# Altium PCB PCB.PcbDoc (part 4 of 9)
Units mil, origin at the board's own origin, x right, y up, seen from the top; angles counter-clockwise.
Board outline 4330.71 x 3149.61 mil, 8 copper layers (L1_TOP, L2_GND, L3_SIG, L4_PWR, L5_PWR, L6_SIG, L7_GND, L8_BOT), stack 62.406 mil thick; 660 components, 433 nets, 2602 pads, 1254 vias.
Unrouted connection lines stored in the file: 930.
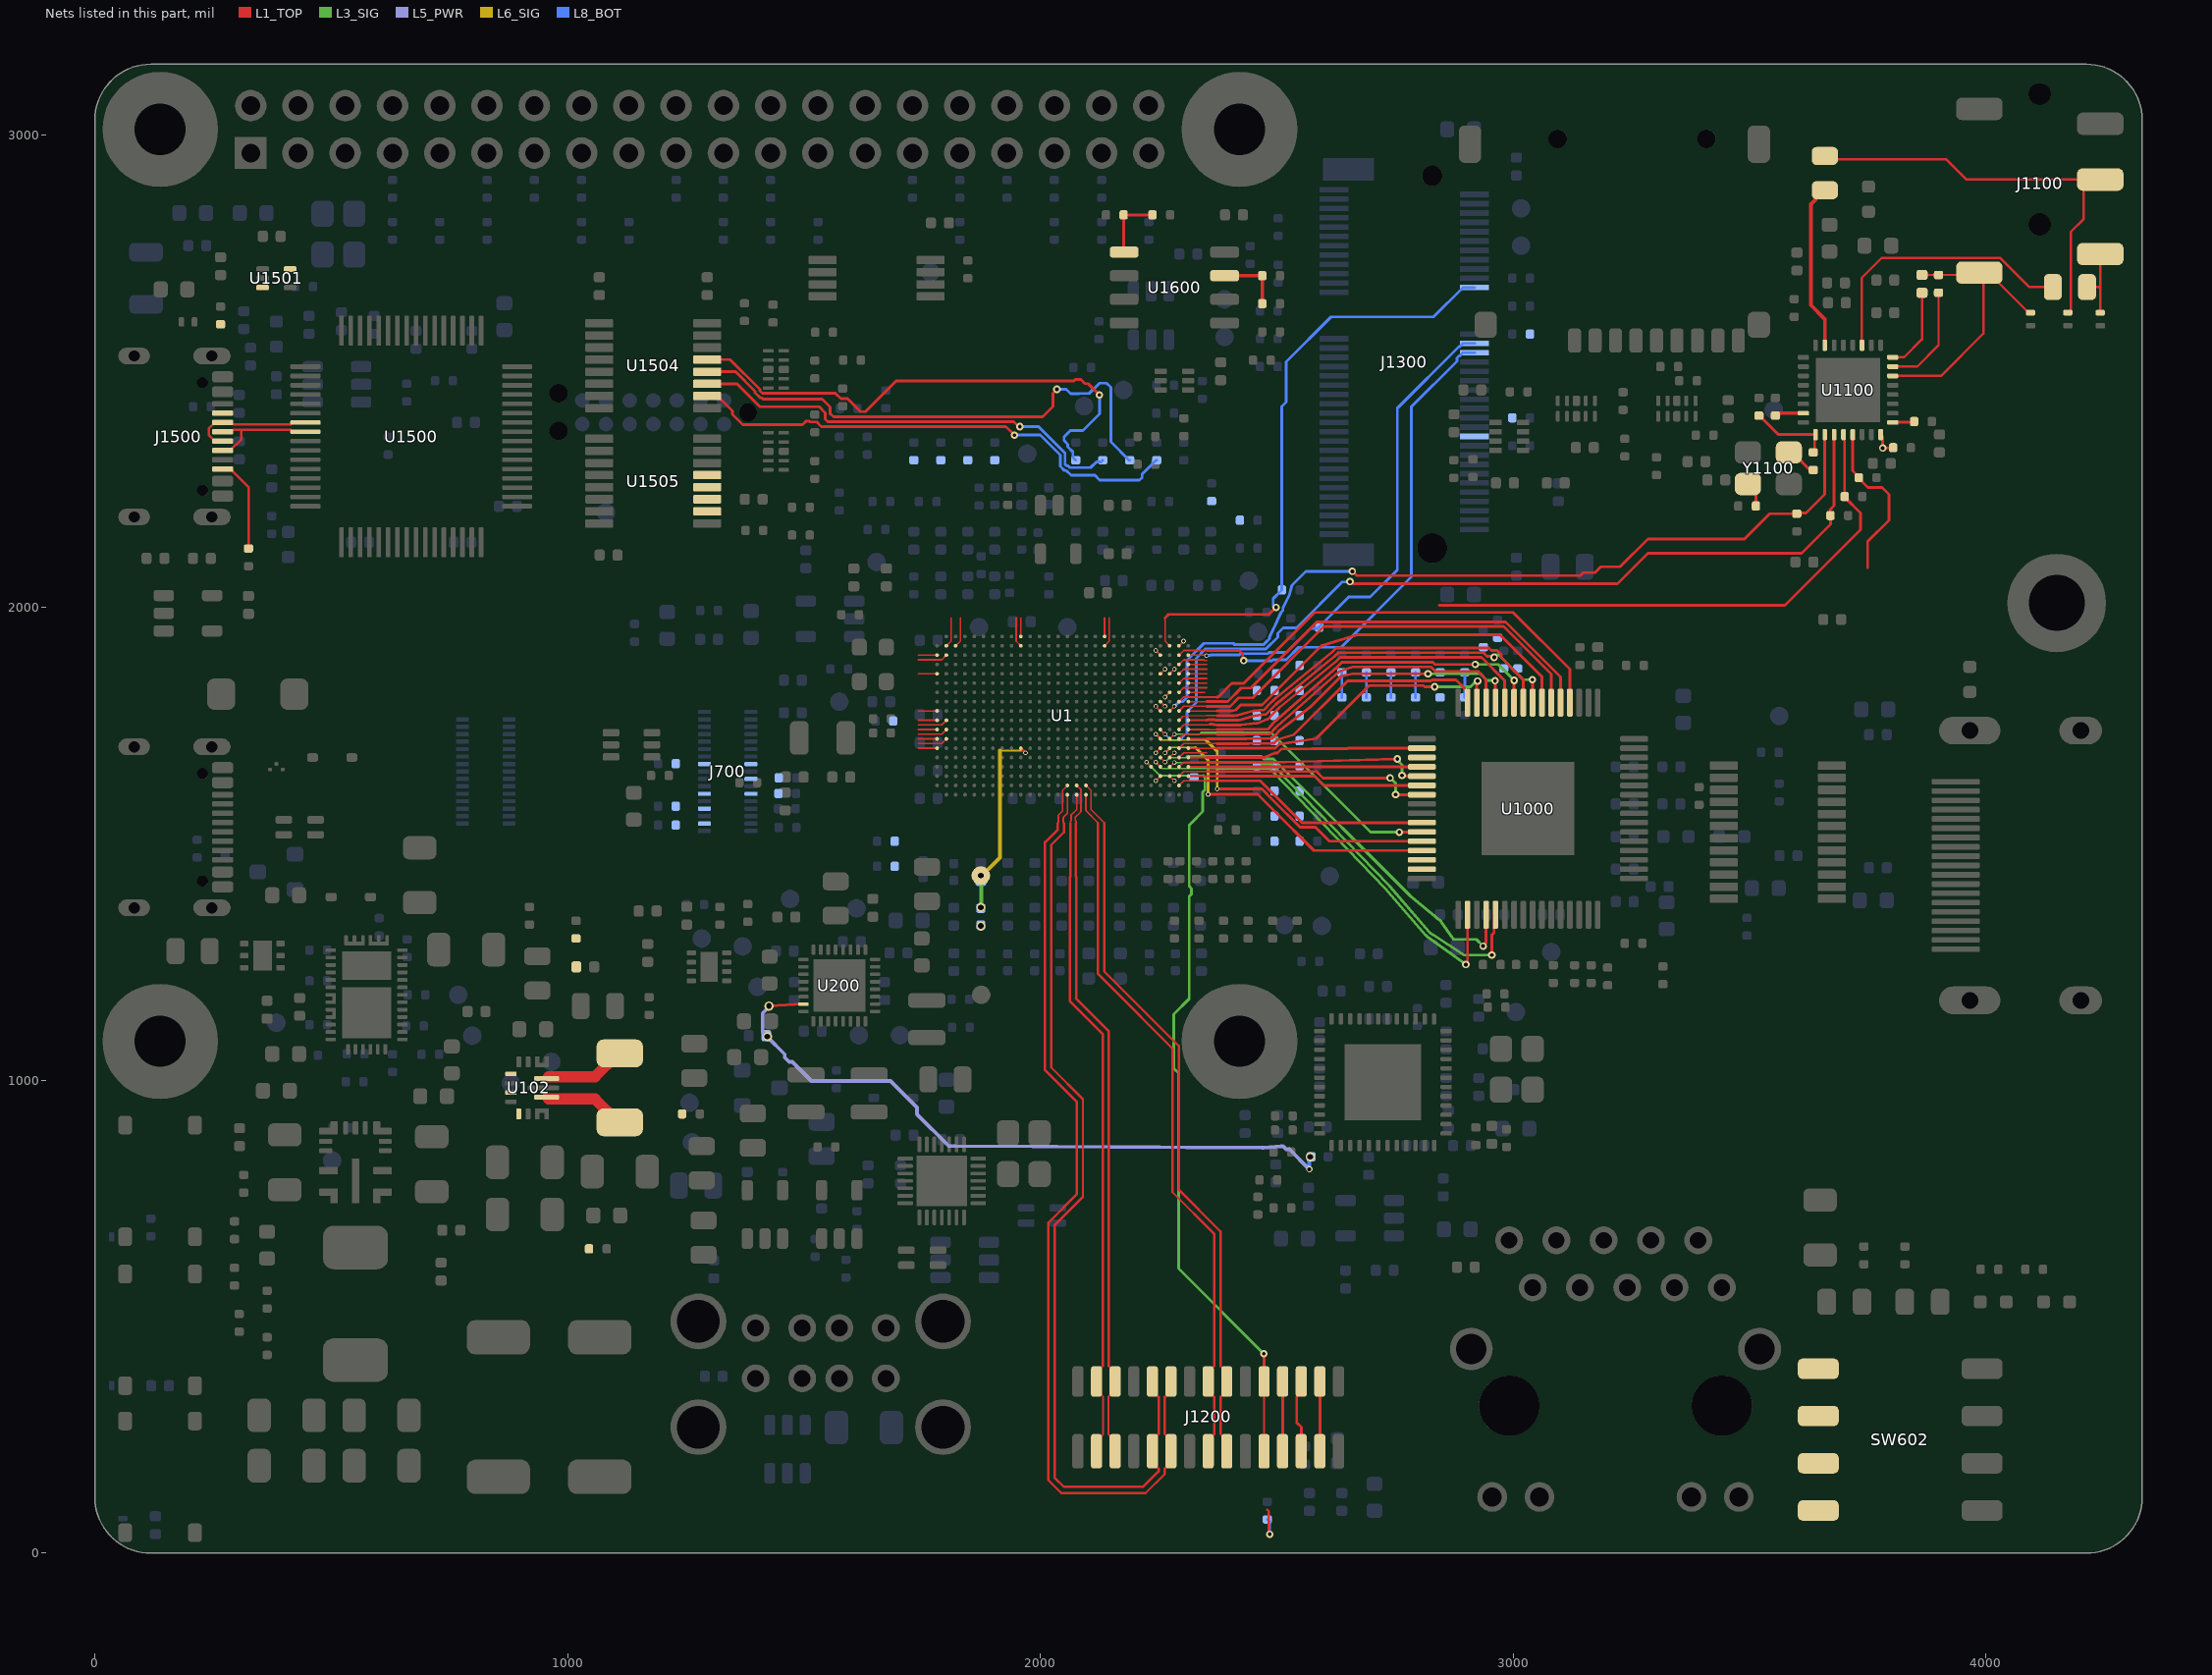
[diagram p7: the nets of this part, all layers, seen from the top]

## Via types
v1: diameter 19.68, hole 11.81, L1_TOP to L8_BOT, 865 vias
v2: diameter 9.84, hole 5.91, L1_TOP to L8_BOT, 246 vias
v3: diameter 15.75, hole 7.87, L1_TOP to L8_BOT, 125 vias
v4: diameter 13.78, hole 7.87, L1_TOP to L8_BOT, 18 vias

## Nets (pads, with @x,y where several pads share a name; then routed paths per layer and width w, separated by ;. In a path a pad name is that pad's centre, name@x,y a point inside that pad or via, vN(x,y) a via of type N, cw(c..) or ccw(c..) an arc to the next point about the centre after c; other vN are vias at no path point) (continued)
DBG_MAIN_UART0_TXD: (continued)
  L1_TOP w5.91: U1504.11@1295.28,2473.43 1358.37,2473.43 1406.79,2425 1532.27,2425 1545,2412.27 1545,2398.46 1550.27,2393.19 1943.63,2393.19 1953.87,2382.96 v3(1956.53,2382.96)
  L8_BOT w5.91: v3(1956.53,2382.96) 1995.96,2382.96 2051.96,2326.96 2051.96,2303.46 2055.42,2300 2058.92,2300 2062.66,2296.26 2106.26,2296.26 2118.54,2308.54 2128.42,2308.54 R1512.2@2131.89,2312.01
DBG_MAIN_UART1_RXD: R1513.2 U1.A19 U1504.12 | length 1170.9
  L1_TOP w3.54: U1.A19@2135.83,1938.98 2135.83,1978.35
  L1_TOP w5.91: U1504.12@1295.28,2499.02 1355.27,2499.02 1396.65,2457.64 1396.65,2454.85 1407.61,2443.9 1410.39,2443.9 1413.15,2441.14 1538.86,2441.14 1555.43,2424.57 1555.43,2410.65 1562.54,2403.54 2004.62,2403.54 2026.79,2425.71 2026.79,2453.79 v3(2034.99,2462)
  L8_BOT w5.91: v3(2034.99,2462) 2054.95,2462 2064.1,2452.84 2081.4,2452.84 2081.51,2452.95 2102.95,2452.95 2125,2475 2140,2475 2149.02,2465.98 2149.02,2350.98 2187.99,2312.01 R1513.2@2188.98,2312.01
DBG_MAIN_UART1_TXD: R1514.2 U1.B19 U1504.10 | length 1134.2
  L1_TOP w3.54: U1.B19@2135.83,1919.29 2145.67,1929.13 2145.67,1978.35
  L1_TOP w5.91: U1504.10@1295.28,2447.83 1315.94,2447.83 1325.79,2437.99 1326.52,2437.99 1348.35,2416.16 1348.35,2408.84 1370.18,2387.01 1497.01,2387.01 1505,2395 1510.57,2395 1512.85,2392.72 1527.15,2392.72 1536.52,2383.35 1926.65,2383.35 v3(1945,2365)
  L8_BOT w5.91: v3(1945,2365) 2000,2365 2042.12,2322.88 2042.12,2298.96 2050.92,2290.16 2054.84,2290.16 2065,2280 2115.33,2280 2125.65,2269.68 2209.68,2269.68 2215,2275 2215,2281.93 2245.08,2312.01 R1514.2@2246.06,2312.01
DBG_MCU_UART0_RXD: R1515.2 U1.B2 U1505.13 | length 63.1
  L1_TOP w3.54: U1.B2@1801.18,1919.29 1811.02,1929.13 1811.02,1978.35
DBG_MCU_UART0_TXD: R1516.2 U1.B3 U1505.11 | length 63.1
  L1_TOP w3.54: U1.B3@1820.87,1919.29 1830.71,1929.13 1830.71,1978.35
DBG_USB_CC1: J1500.A5 R1500.1
DBG_USB_CC2: J1500.B5 R1501.1 | length 200.7
  L1_TOP w5.12: J1500.B5@270.08,2293.31 286.61,2293.31 324.8,2255.12 R1501.1@324.8,2125
DBG_USB_DM: J1500.A7 J1500.B7 U1500.7 U1501.5 | length 261.6
  L1_TOP w5.34: J1500.A7@270.08,2352.36 253.54,2352.36 241.03,2364.88 241.03,2379.22 253.54,2391.73 J1500.B7@270.08,2391.73 273.14,2388.67 291.87,2388.67 292.98,2387.56 414.13,2387.56 418.31,2391.73 U1500.7@445.37,2391.73
DBG_USB_DP: J1500.A6 J1500.B6 U1500.8 U1501.3 | length 248.5
  L1_TOP w5.34: J1500.B6@270.08,2332.68 286.61,2332.68 310,2356.06 310,2376.22 ; J1500.A6@270.08,2372.05 273.14,2375.11 291.87,2375.11 292.98,2376.22 310,2376.22 ; U1500.8@445.37,2372.05 418.31,2372.05 414.13,2376.22 310,2376.22
DBG_WKUP_UART0_RXD: R1517.2 U1.C2 U1505.12 | length 63.1
  L1_TOP w3.54: 1742.13,1889.76 1791.34,1889.76 U1.C2@1801.18,1899.61
DBG_WKUP_UART0_TXD: R1518.2 U1.C1 U1505.10 | length 39.4
  L1_TOP w3.54: 1742.13,1899.61 U1.C1@1781.5,1899.61
DDR4_VPP_2V5: C219.1 FB302.1 FB800.1 U200.23 | length 1451.6
  L1_TOP w6.3: v1(1426.18,1157.48) U200.23@1499.02,1161.42
  L5_PWR w7.87: v1@1427.17,1156.5 1412.4,1141.73 1412.4,1102.36 1422.24,1092.52 1459.25,1055.51 1459.25,1048.48 1468.48,1039.25 1475.51,1039.25 1515.75,999.02 1683.07,999.02 1739.25,942.83 1739.25,928.48 1806.51,861.22 1820.87,861.22 2469.89,857.28 ccw(c2470,875) 2471.64,857.36 2509.48,860.88 cw(c2510.21,853.04) 2515.78,858.61 2520.13,854.25 2526.65,854.25 v4(2568.9,812.01)
  L8_BOT w7.87: v4(2568.9,812.01) FB800.1@2568.9,836.61
  L8_BOT w15.75: C219.1@1420.47,1094.49 v1(1422.44,1092.52) ; v1(2570.87,838.58) FB800.1@2572.83,838.58
  other v1: 1874.02,1326.77
DDR4_VPP_2V5_SIP: C321.1 FB302.2 TP307.1 U1.N10 | length 429.1
  L1_TOP w5.91: U1.N10@1958.66,1702.76 v2(1968.5,1692.91)
  L3_SIG w7.87: v1@1875,1368.11 v1@1875,1432.09
  L6_SIG w3.54: 1914.37,1697.83 1963.58,1697.83 v2(1968.5,1692.91)
  L6_SIG w7.87: v1@1875,1432.09 1914.37,1471.46 1914.37,1540.35 1914.37,1697.83
  L8_BOT w15.75: FB302.2@1874.02,1364.17 v1(1874.02,1366.14) ; C321.1@1874.02,1422.05 v1(1874.02,1433.07)
DPI_D0: U1.P26 U1000.63 | length 13.9
  L1_TOP w3.54: U1.P26@2273.62,1683.07 v2(2283.46,1692.91)
DPI_D1: U1.N25 U1000.62 | length 13.9
  L1_TOP w3.54: v2(2244.09,1692.91) U1.N25@2253.94,1702.76
DPI_D2: U1.N26 U1000.61 | length 694.7
  L1_TOP w3.54: v2(2263.78,1692.91) U1.N26@2273.62,1702.76
  L1_TOP w5.91: v2(2355,1605) 2374.02,1605
  L1_TOP w5.94: 2374.02,1605 2460,1605 2492.13,1572.87 2578.78,1486.22 U1000.61@2807.09,1486.22
  L6_SIG w3.54: v2(2263.78,1692.91) 2275.2,1704.33 2328.02,1704.33
  L6_SIG w5.91: 2328.02,1704.33 2355,1677.35 v2(2355,1605)
DPI_D3: U1.M25 U1000.60 | length 717.3
  L1_TOP w3.54: v2(2244.09,1732.28) U1.M25@2253.94,1722.44
  L1_TOP w5.91: v2(2374.02,1616.43) 2468.45,1616.43 2492.13,1592.75 2549.46,1535.42 2581.75,1535.42 2611.26,1505.91 U1000.60@2807.09,1505.91
  L6_SIG w3.54: v2(2244.09,1732.28) 2256.38,1720 2350,1720
  L6_SIG w4.83: v2(2374.02,1616.43) 2374.02,1695.98
  L6_SIG w5.91: 2350,1720 2374.02,1695.98
DPI_D4: U1.M26 U1000.59 | length 625.9
  L1_TOP w3.54: U1.M26@2273.62,1722.44 v2(2283.46,1732.28)
  L1_TOP w5.94: v3(2759.48,1524.95) 2806.44,1524.95 U1000.59@2807.09,1525.59
  L3_SIG w3.54: v2(2283.46,1732.28) 2337.28,1732.28 2340,1735
  L3_SIG w5.91: 2340,1735 2374.02,1735
  L3_SIG w5.94: 2374.02,1735 2488.49,1735 2698.54,1524.95 v3(2759.48,1524.95)
DPI_D5: U1.U27 U1000.58 | length 554.5
  L1_TOP w3.54: U1.U27@2293.31,1624.02 2303.15,1633.86 2352.36,1633.86
  L1_TOP w5.91: 2352.36,1633.86 2373.84,1633.86 2374.02,1633.69
  L1_TOP w5.94: 2374.02,1633.69 2465.14,1633.69 2553.55,1545.28 U1000.58@2807.09,1545.28
DPI_D6: U1.T27 U1000.55 | length 552.7
  L1_TOP w3.54: U1.T27@2293.31,1643.7 2303.15,1653.54 2352.36,1653.54 ; 2374.02,1653.46 2374.02,1653.58
  L1_TOP w5.91: 2352.36,1653.54 2373.98,1653.54
  L1_TOP w5.94: 2374.03,1653.44 2492.13,1653.44 2584.02,1653.44 2597.78,1639.68 v3(2739.88,1639.68) ; v3(2751.56,1604.64) 2751.87,1604.33 U1000.55@2807.09,1604.33
  L3_SIG w5.94: v3(2739.88,1639.68) 2740,1639.8 2740,1640 2751.56,1628.44 v3(2751.56,1604.64)
DPI_D7: U1.T28 U1000.54 | length 502.2
  L1_TOP w3.54: U1.T28@2312.99,1643.7 2373.88,1643.7 2374.02,1643.56
  L1_TOP w5.63: 2374.02,1643.56 2378.08,1643.56
  L1_TOP w5.94: 2378.08,1643.56 2492.13,1643.56 2579.93,1643.56 2599.47,1624.02 U1000.54@2807.09,1624.02
DPI_D8: U1.R27 U1000.53 | length 547.7
  L1_TOP w3.54: U1.R27@2293.31,1663.39 2303.15,1673.23 2352.36,1673.23
  L1_TOP w5.91: 2352.4,1673.26 2373.95,1673.26 2374.02,1673.19 2378.15,1673.19
  L1_TOP w5.94: 2378.15,1673.19 2477.5,1673.19 2477.64,1673.33 2492.13,1673.33 2518.57,1673.33 v3(2755,1680) ; v3(2765,1645) 2766.3,1643.7 U1000.53@2807.09,1643.7
  L3_SIG w5.94: v3(2755,1680) 2755,1677.35 2765,1667.35 v3(2765,1645)
DPI_D9: U1.R28 U1000.52 | length 494.3
  L1_TOP w3.54: U1.R28@2312.99,1663.39 2352.36,1663.39 ; 2374.02,1663.39 2374.02,1663.45
  L1_TOP w5.91: 2352.36,1663.39 2374.02,1663.39 2374.02,1663.32 2378.2,1663.32
  L1_TOP w5.94: 2378.22,1663.32 2480.99,1663.32 2481.06,1663.39 2492.13,1663.39 U1000.52@2807.09,1663.39
DPI_D10: U1.P27 U1000.51 | length 63.1
  L1_TOP w3.54: U1.P27@2293.31,1683.07 2303.15,1692.91 2352.36,1692.91
DPI_D11: U1.P28 U1000.50 | length 499.8
  L1_TOP w3.54: U1.P28@2312.99,1683.07 2352.36,1683.07
  L1_TOP w5.91: 2352.36,1683.07 2374.02,1683.07
  L1_TOP w5.94: 2374.02,1683.07 2470.95,1683.07 2473.41,1683.07 2473.55,1683.21 2492.13,1690.77 2495.88,1692.3 2501.5,1692.74 2509.8,1701.04 2574.6,1701.79 2579.52,1701.79 ; 2579.55,1701.75 2650.02,1701.75 2651.02,1702.76 U1000.50@2807.09,1702.76
DPI_D12: U1.N27 U1000.47 | length 700.8
  L1_TOP w3.54: U1.N27@2293.31,1702.76 2303.15,1712.6 2371.86,1712.6 2374.02,1712.37
  L1_TOP w5.94: 2374.02,1712.37 2393.65,1712.37 2394.09,1712.36 2440.13,1712.36 2440.27,1712.49 2490.29,1713.47 2492.13,1713.51 2493.6,1713.55 2495.06,1714.23 2501.62,1720.79 2536.62,1731.62 2650.24,1845.24 2813.86,1845.24 ; 2813.88,1845.22 2826.12,1845.22 2828.33,1847.43 2879.11,1847.43 2896.67,1829.87 2896.67,1829.71 2903.54,1822.83 U1000.47@2903.54,1799.21
DPI_D13: U1.N28 U1000.46 | length 715.7
  L1_TOP w3.54: U1.N28@2312.99,1702.76 2374.02,1702.5
  L1_TOP w5.94: 2374.02,1702.5 2389.58,1702.48 2444.22,1702.48 2488.2,1702.62 2497.41,1702.62 2505.71,1710.92 2582.95,1722.95 2695.36,1835.36 2809.77,1835.36 2812.48,1832.65 v3(2833.9,1832.65) ; U1000.46@2923.23,1799.21 2923.23,1843.23 v3(2925,1845)
  L3_SIG w5.94: v3(2833.9,1832.65) 2909.99,1832.65 2922.35,1845 v3(2925,1845)
DPI_D14: U1.M27 U1000.45 | length 766
  L1_TOP w3.54: U1.M27@2293.31,1722.44 2303.15,1732.28 2356.29,1732.28 2372.63,1732.25 2373.09,1732.23 2374.02,1732.15
  L1_TOP w5.94: 2374.02,1732.13 2401.83,1732.13 2402.28,1732.11 2431.95,1732.11 2432.09,1732.25 2485.69,1733.23 2486.55,1733.99 2490.92,1738.36 2492.13,1739.89 2493.8,1742.02 2494.02,1742.28 2495.41,1743.89 2495.44,1743.93 2501.23,1749.72 2632.04,1864.99 2632.97,1865.31 2660.81,1874.78 2826.12,1874.78 2835.68,1865.22 2925.68,1865.22 2942.91,1847.99 U1000.45@2942.91,1799.21
DPI_D15: U1.M28 U1000.44 | length 752.9
  L1_TOP w3.54: U1.M28@2312.99,1722.44 2352.36,1722.44
  L1_TOP w5.91: 2352.36,1722.44 2369.92,1722.38 2372.82,1722.37 2374.02,1722.25
  L1_TOP w5.94: 2374.02,1722.25 2397.74,1722.25 2398.18,1722.23 2436.04,1722.23 2436.18,1722.37 2489.43,1723.35 2489.85,1723.42 2490.56,1723.77 2490.97,1724.11 2492.13,1725.27 2498.49,1731.64 2500.8,1734.27 2503.68,1738.11 2505.32,1739.84 2571.74,1790.72 2636.13,1855.12 2637.89,1855.47 2660.45,1860 v3(2820,1860) ; v3(2961.62,1845.25) 2962.6,1844.28 U1000.44@2962.6,1799.21
  L3_SIG w5.94: v3(2820,1860) 2930.9,1860 2944.84,1846.06 2960.82,1846.06 v3(2961.62,1845.25)
DPI_D16: R628.2 R629.1 U1.L27 U1000.43 | length 811.2
  L1_TOP w3.54: U1.L27@2293.31,1742.13 2303.15,1751.97 2354.51,1751.97 2355.5,1751.97 2358.94,1753.94 2359.04,1753.94 ; 2374.02,1751.93 2374.02,1752.29
  L1_TOP w5.91: 2359.04,1753.94 2363.94,1753.94 2365.8,1753.12 2367.64,1752.76 ; 2367.68,1752.75 2370.1,1752.29 2374.02,1752.29 ; 2374.02,1751.88 2374.02,1751.93
  L1_TOP w5.94: 2374.02,1751.88 2410.01,1751.88 2410.46,1751.87 2423.77,1751.87 2423.99,1752.09 2458.89,1755.45 2481.29,1764.38 2492.13,1775.2 2505.91,1788.97 2625.59,1886.49 2633.89,1894.78 2933,1894.78 2982.28,1845.5 U1000.43@2982.28,1799.21
DPI_D17: R630.2 R631.1 U1.L28 U1000.42 | length 807.3
  L1_TOP w3.54: U1.L28@2312.99,1742.13 2356.25,1742.13 2374.02,1742.01
  L1_TOP w5.94: 2374.02,1742.01 2405.92,1742.01 2406.37,1741.99 2427.86,1741.99 2428.08,1742.21 2481.6,1743.1 2483.14,1744.65 2492.1,1755.43 ; 2492.13,1755.45 2494.04,1757.36 2627.95,1874.87 2629.69,1876.61 2637.73,1884.66 2830.21,1884.66 2834.87,1880 v3(2920,1880) ; U1000.42@3001.97,1799.21 3001.97,1845.83 v3(3002.32,1846.19)
  L3_SIG w5.94: v3(2920,1880) 2968.51,1880 v3(3002.32,1846.19)
DPI_D18: R632.2 R633.1 U1.K27 U1000.41 | length 914.7
  L1_TOP w3.54: U1.K27@2293.31,1761.81 2301.41,1769.91 2309.16,1771.06 2351.71,1771.65 2372.4,1771.65 2374.02,1771.6
  L1_TOP w5.94: 2374.02,1771.6 2409.51,1771.6 2416.84,1772.13 2448.65,1781.03 2451.79,1781.47 2473.11,1784.14 2488.03,1799.06 2492.13,1803.16 2497.53,1808.56 2497.73,1808.72 2617.57,1906.4 2625.71,1914.53 2949.12,1914.53 2953.88,1909.78 2966.12,1909.78 2974.78,1901.12 2974.78,1894.63 3021.65,1847.76 U1000.41@3021.65,1799.21
  L8_BOT w5.94: R633.1@2897.64,1810.04 R632.2@2897.64,1863.19
DPI_D19: R634.2 R635.1 U1.K28 U1000.40 | length 855.6
  L1_TOP w3.54: U1.K28@2312.99,1761.81 2350.51,1761.81
  L1_TOP w5.91: 2350.51,1761.81 2351.01,1761.81 2355.13,1763.39 2367.85,1763.39 2369.06,1762.74 2370.09,1762.19 2374.02,1761.74 2414.12,1761.74
  L1_TOP w5.94: 2414.12,1761.74 2419.68,1761.74 2419.9,1761.96 2453.19,1771.59 2477.2,1774.26 2488.02,1785.08 2492.13,1789.18 2501.69,1798.74 2501.83,1798.85 2619.92,1894.78 2621.65,1896.51 2629.8,1904.66 2937.09,1904.66 2944.87,1896.88 2958.12,1896.88 v3(2960,1895) ; v3(3040.75,1847.63) 3041.34,1847.05 U1000.40@3041.34,1799.21
  L3_SIG w5.94: v3(2960,1895) 2960,1896.52 2963.48,1900 2969.42,1900 3021.78,1847.63 v3(3040.75,1847.63)
DPI_D20: R636.2 R637.1 U1.J28 U1000.39 | length 952.8
  L1_TOP w3.54: U1.J28@2312.99,1781.5 2354.44,1781.5 2374.02,1781.48
  L1_TOP w5.94: 2374.02,1781.48 2405.42,1781.48 2413.24,1783.24 2424.02,1794.02 2469.02,1794.02 2492.13,1817.13 2594.69,1919.69 2596.12,1920.12 2670.59,1942.65 2972.35,1942.65 3061.02,1853.98 U1000.39@3061.02,1799.21
  L8_BOT w5.94: R637.1@2793.7,1810.04 R636.2@2793.7,1863.19
DPI_D21: R638.2 R639.1 U1.J27 U1000.38 | length 1016.3
  L1_TOP w3.54: U1.J27@2293.31,1781.5 2303.15,1791.34 2352.36,1791.34
  L1_TOP w5.91: 2352.36,1791.34 2374.02,1791.34 2401.34,1791.34 2419.17,1809.17 2449.17,1809.17 2600,1960 2980,1960 3080.71,1859.29 U1000.38@3080.71,1799.21
  L8_BOT w5.94: R639.1@2741.73,1810.04 R638.2@2741.73,1863.19
DPI_D22: R640.2 R641.1 U1.H28 U1000.37 | length 1012.9
  L1_TOP w3.54: U1.H28@2312.99,1801.18 2352.36,1801.18
  L1_TOP w5.91: 2352.36,1801.18 2374.02,1801.18 2396.18,1801.18 2425,1830 2445,1830 2584.84,1969.84 2984.08,1969.84 3100.39,1853.53 U1000.37@3100.39,1799.21
  L8_BOT w5.94: R641.1@2689.76,1810.04 R640.2@2689.76,1863.19
DPI_D23: R642.2 R643.1 U1.H27 U1000.36 | length 1078.6
  L1_TOP w3.54: U1.H27@2293.31,1801.18 2303.15,1811.02 2374.02,1811.02
  L1_TOP w5.91: 2374.02,1811.02 2376.02,1811.02 2405,1840 2430,1840 2580,1990 3000,1990 3120.08,1869.92 U1000.36@3120.08,1799.21
  L8_BOT w5.94: R643.1@2637.8,1810.04 R642.2@2637.8,1863.19
DPI_DE: U1.R25 U1000.2 | length 955.7
  L1_TOP w3.54: v2(2244.09,1673.23) U1.R25@2253.94,1663.39
  L1_TOP w5.94: v3(2900,1245) 2903.54,1248.54 U1000.2@2903.54,1350.39
  L3_SIG w3.54: v2(2244.09,1673.23) 2257.32,1660 2374.02,1660
  L3_SIG w5.94: 2374.02,1660 2485,1660 2488.48,1656.52 2492.13,1652.74 2729.78,1406.12 2814.88,1307.62 ccw(c2835,1325) 2819.39,1303.47 v3(2900,1245)
DPI_HSYNC: U1.P25 U1000.4 | length 927.4
  L1_TOP w3.54: U1.P25@2253.94,1683.07 v2(2263.78,1673.23)
  L1_TOP w5.91: v3(2936.48,1284.19) 2942.91,1290.62 U1000.4@2942.91,1350.39
  L3_SIG w3.54: v2(2263.78,1673.23) 2273.23,1682.68 2307.68,1682.68 2310,1685
  L3_SIG w5.91: 2310,1685 2374.02,1685 2467.5,1685 2472.8,1679.7 2492.13,1679.7 2493.16,1679.7 2782.12,1390.75 2845.7,1337.86 cw(c2835,1325) 2848.82,1334.43 2871.18,1301.69 2874.64,1298.23 2877.08,1298.23 2922.45,1298.23 v3(2936.48,1284.19)
DPI_PCLK: R1000.1 U1.T26 | length 13.9
  L1_TOP w3.54: U1.T26@2273.62,1643.7 v2(2283.46,1633.86)
DPI_VSYNC: U1.R26 U1000.5 | length 944.6
  L1_TOP w3.54: U1.R26@2273.62,1663.39 2274.02,1663.39 2283.07,1672.44 v2(2283.46,1672.44)
  L1_TOP w5.91: v3(2955,1265) 2955,1307.66 2959.65,1312.31 2959.65,1347.44 U1000.5@2962.6,1350.39
  L3_SIG w3.54: v2(2283.46,1672.44) 2373.23,1672.44
  L3_SIG w5.91: 2373.23,1672.44 2374.02,1673.23 2465.35,1673.23 2468.72,1669.86 2489.08,1669.86 2492.13,1666.82 2498.34,1660.6 2737.01,1412.84 2739.64,1410.1 2822.31,1314.1 ccw(c2835,1325) 2825.64,1311.13 2829.88,1308.27 2896.39,1265 v3(2955,1265)
EEPROM_A0: R1600.2 R1601.1 U1600.1 | length 140.2
  L1_TOP w5.91: U1600.1@2177.17,2752.16 2176.18,2753.15 R1600.2@2176.18,2830.91 R1601.1@2237.21,2830.91
EEPROM_WP: R1602.1 R1603.2 U1600.7 | length 138.8
  L1_TOP w7.87: U1600.7@2389.76,2702.16 R1602.1@2469.49,2702.16 R1603.2@2469.49,2643.11
EMMC_CLK: R700.1 U1.J1 | length 39.4
  L1_TOP w3.54: 1742.13,1781.5 U1.J1@1781.5,1781.5
EMMC_CMD: J700.25 R701.2 U1.K1 | length 39.4
  L1_TOP w3.54: 1742.13,1761.81 U1.K1@1781.5,1761.81
EMMC_D0: J700.6 R702.2 U1.K2 | length 63.1
  L1_TOP w3.54: 1742.13,1751.97 1791.34,1751.97 U1.K2@1801.18,1761.81
EMMC_D1: J700.29 R703.2 U1.L1 | length 39.4
  L1_TOP w3.54: 1742.13,1742.13 U1.L1@1781.5,1742.13
EMMC_D2: J700.27 R704.2 U1.L2 | length 63.1
  L1_TOP w3.54: 1742.13,1732.28 1791.34,1732.28 U1.L2@1801.18,1742.13
EMMC_D3: J700.10 R705.2 U1.M1 | length 39.4
  L1_TOP w3.54: 1742.13,1722.44 U1.M1@1781.5,1722.44
EMMC_D4: J700.4 R706.2 U1.M2 | length 63.1
  L1_TOP w3.54: 1742.13,1712.6 1791.34,1712.6 U1.M2@1801.18,1722.44
EMMC_D5: J700.2 R707.2 U1.N1 | length 39.4
  L1_TOP w3.54: 1742.13,1702.76 U1.N1@1781.5,1702.76